# Altium PCB PCB2.PcbDoc
Units mil, origin at the board's own origin, x right, y up, seen from the top; angles counter-clockwise.
Board outline 6000 x 4000 mil, 2 copper layers (Top Layer, Bottom Layer); 34 components, 15 nets, 86 pads, 0 vias.
Unrouted connection lines stored in the file: 14.
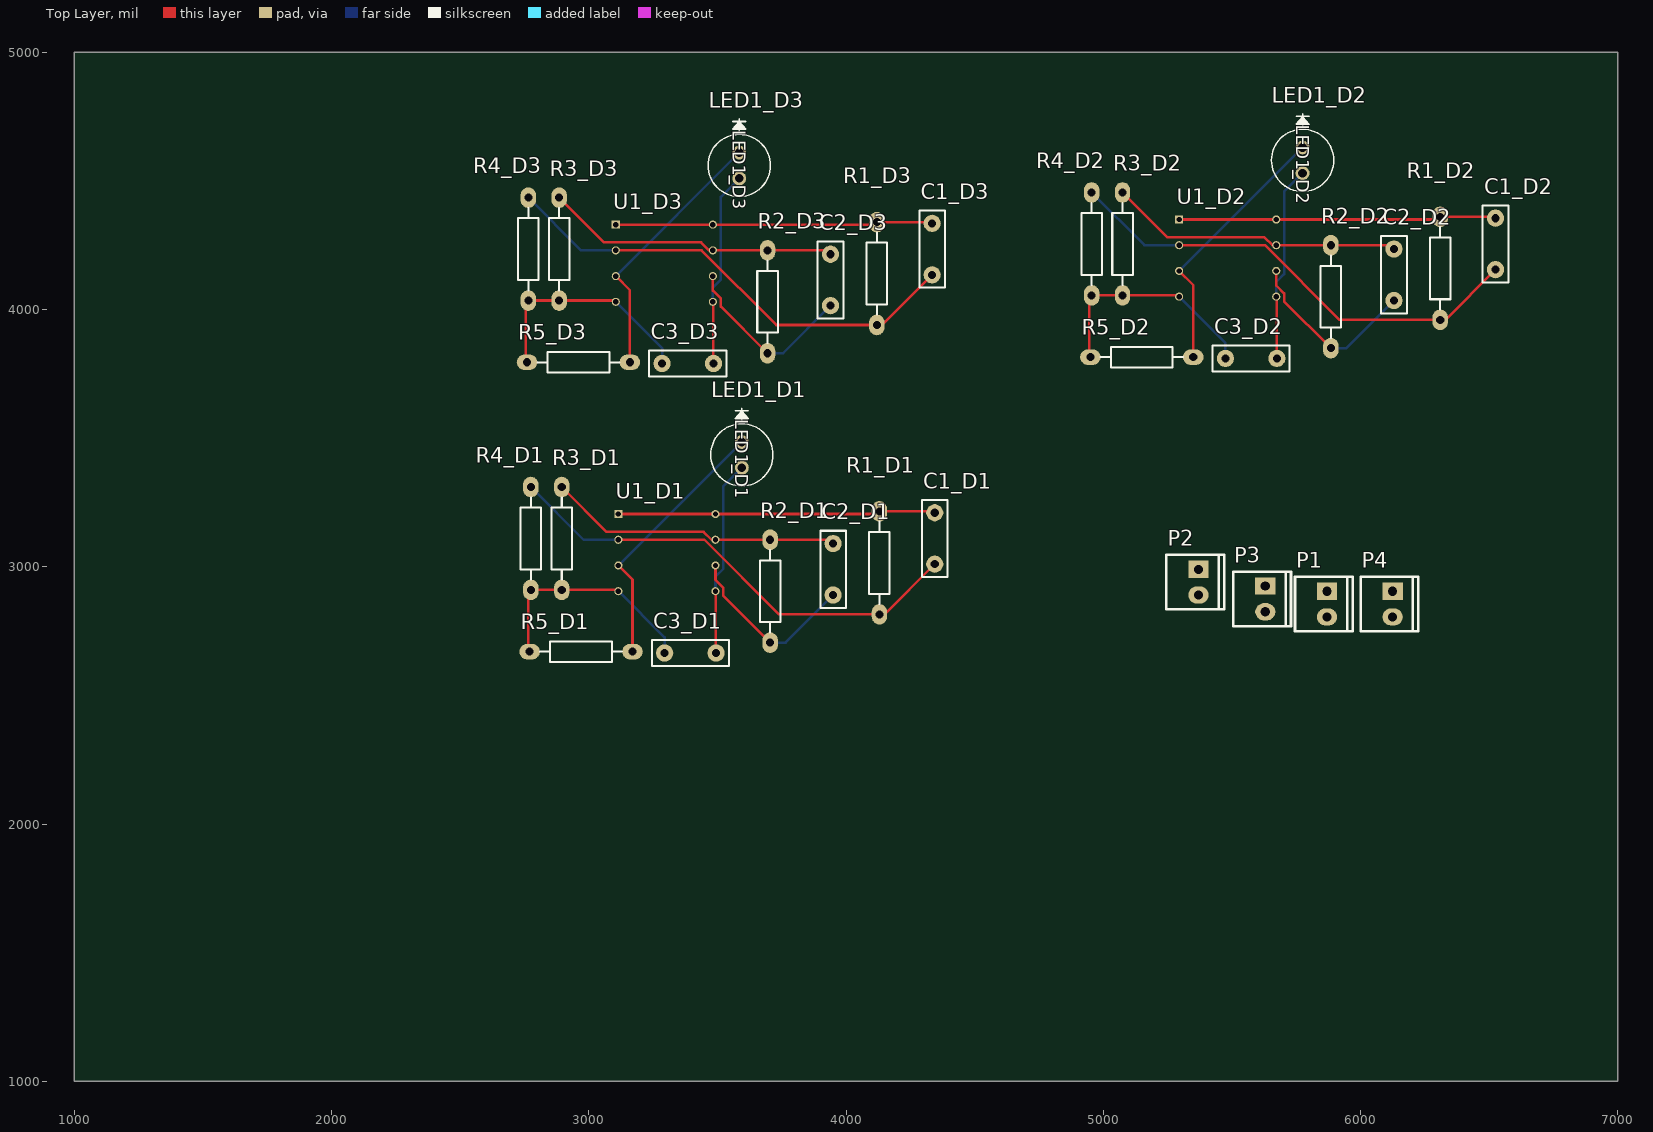
[diagram p0: Top Layer view]
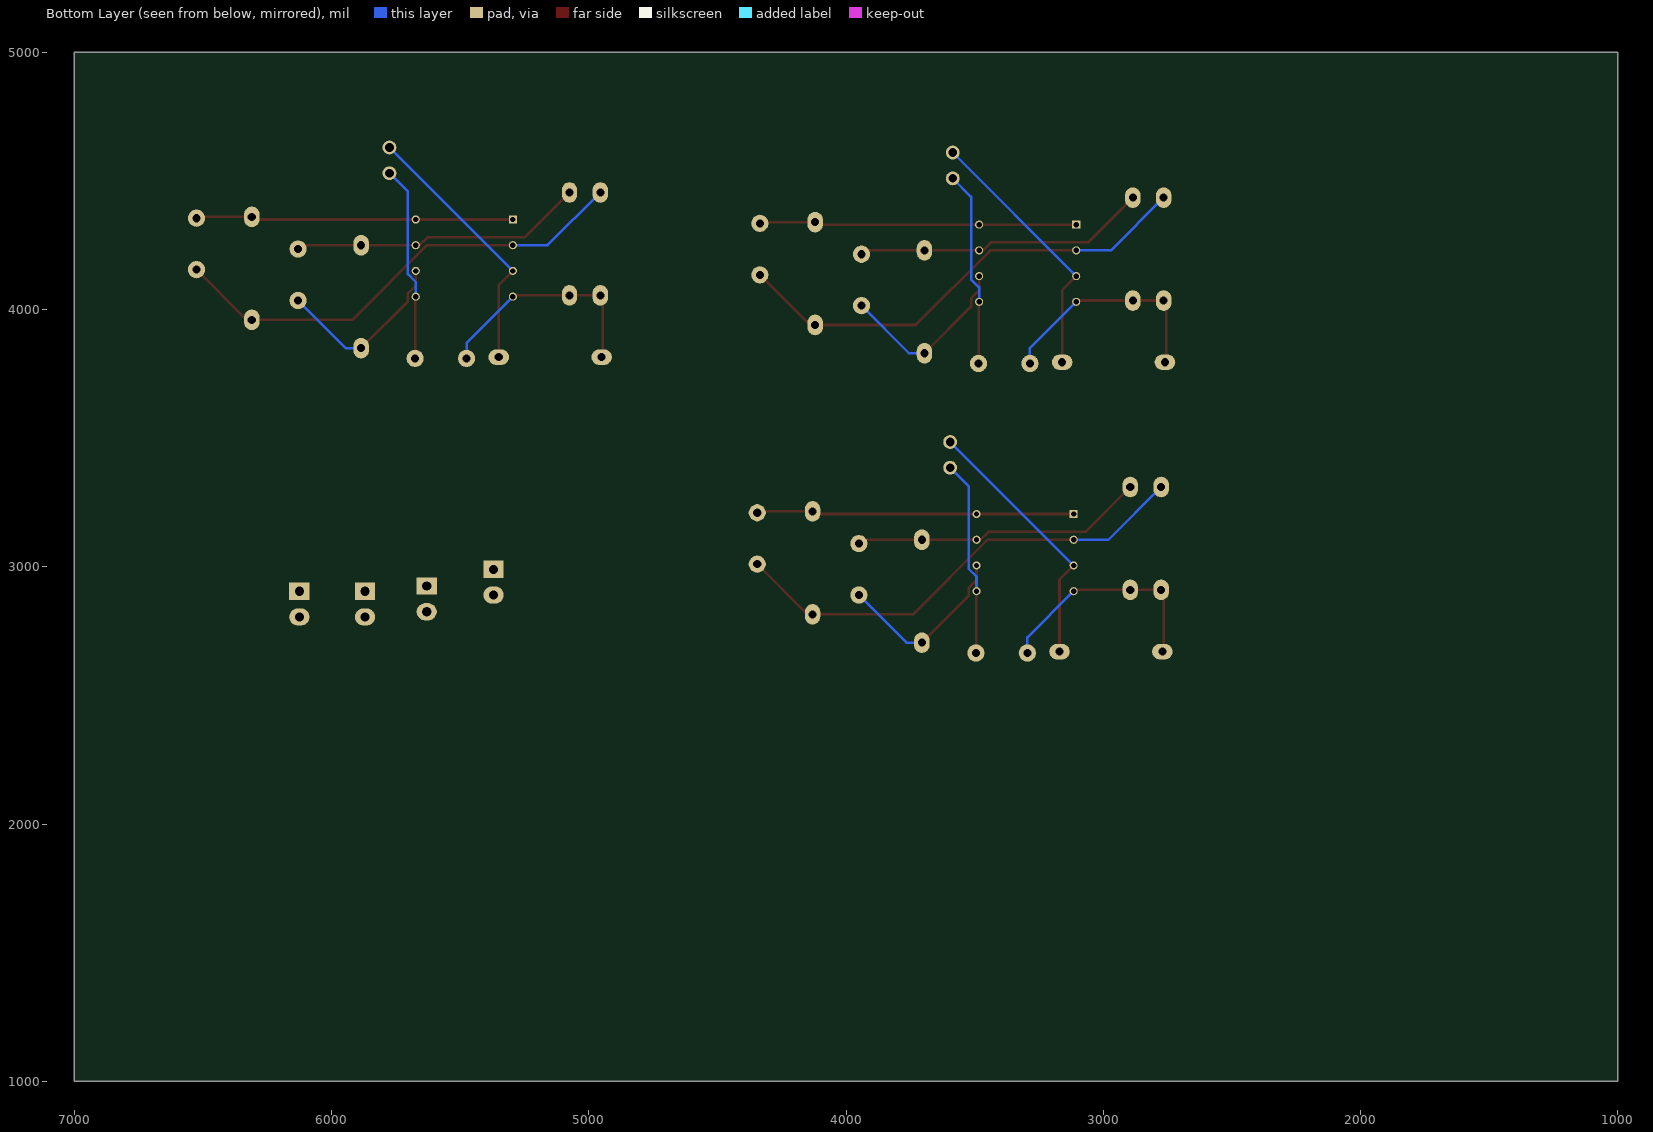
[diagram p1: Bottom Layer view, seen from below]
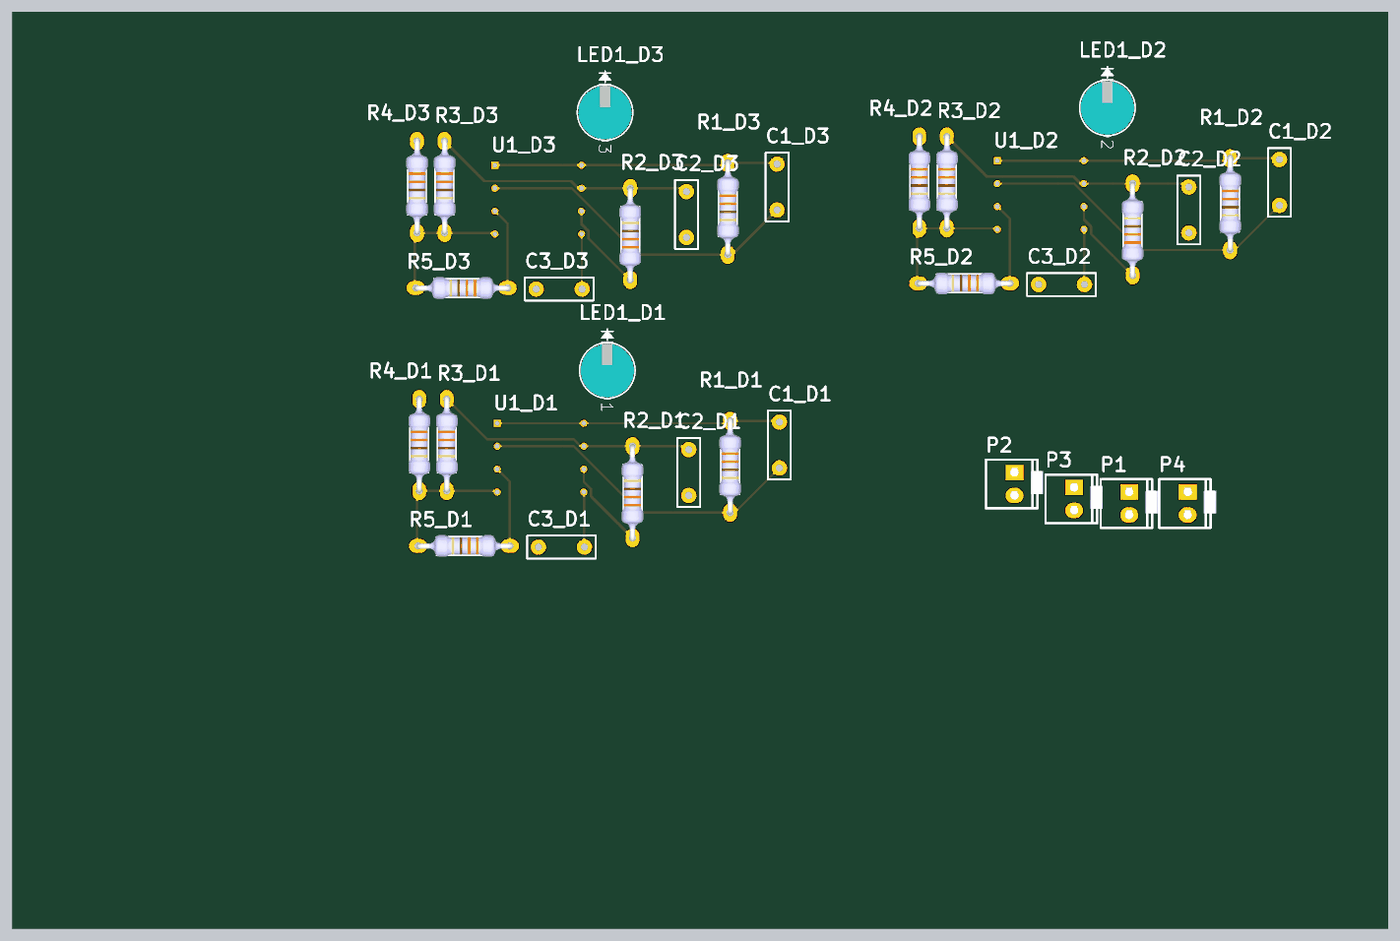
[diagram p2: 3D render of the assembled board from above, using the file's embedded part models]

## Layer stack, top to bottom
Top Solder: solder mask 0.4, Solder Resist, Dk 3.5
Top Layer: signal copper 1.4
Dielectric 1: dielectric 12.6, FR-4, Dk 4.8
Bottom Layer: signal copper 1.4
Bottom Solder: solder mask 0.4, Solder Resist, Dk 3.5

## Board outline
1000,1000 7000,1000 7000,5000 1000,5000

## Design rules (kind name [scope] priority, off if disabled: settings)
Clearance [All] p1: gap=10 ignorepadtopadclearanceinfootprint=FALSE
PolygonConnect [All] p1: connectstyle=Relief reliefconductorwidth=10 reliefentries=4 polygonreliefangle="90 Angle" airgapwidth=10
RoomDefinition D3 [InComponentClass('D3')] p1: confinementstyle=ConfineIn formatcopy=TRUE lockcomponents=FALSE outline 2500,3715 4590,3715 4590,4674.84 2500,4674.84
RoomDefinition D2 [InComponentClass('D2')] p2: confinementstyle=ConfineIn formatcopy=TRUE lockcomponents=FALSE outline 4690,3735 6780,3735 6780,4694.84 4690,4694.84
RoomDefinition D1 [InComponentClass('D1')] p3: confinementstyle=ConfineIn formatcopy=TRUE lockcomponents=FALSE outline 2510,2590 4600,2590 4600,3549.84 2510,3549.84
RoomDefinition 311prac [InComponentClass('311prac')] p4: confinementstyle=ConfineIn formatcopy=TRUE lockcomponents=FALSE outline 5075,2735 6255,2735 6255,3075 5075,3075
RoutingVias [All] p1: holewidth=28 width=50 viastyle="Through Hole" minholewidth=28 minwidth=50 maxholewidth=28 maxwidth=50
SolderMaskExpansion [All] p1: expansion=4 istentingtop=FALSE
SupplyNets "Schematic Supply Nets_5" [InNet('GND')] p1: voltage=0.000
SupplyNets "Schematic Supply Nets_4" [InNet('Photo C-V1')] p2: voltage=0.000
SupplyNets "Schematic Supply Nets_3" [InNet('PhotoOut')] p3: voltage=0.000
SupplyNets "Schematic Supply Nets_2" [InNet('PhotoOut3')] p4: voltage=0.000
SupplyNets "Schematic Supply Nets_1" [InNet('PhotoOut2')] p5: voltage=0.000
SupplyNets "Schematic Supply Nets" [InNet('+5')] p6: voltage=0.000
Width [All] p1: maxlimit=10 minlimit=10 preferedwidth=10
30 further rules are at their usual default settings.

## Classes and differential pairs
channel class LightSense: D1 D2 D3
component class D3: C1_D3 C2_D3 C3_D3 LED1_D3 R1_D3 R2_D3 R3_D3 R4_D3 R5_D3 U1_D3
component class D2: C1_D2 C2_D2 C3_D2 LED1_D2 R1_D2 R2_D2 R3_D2 R4_D2 R5_D2 U1_D2
component class D1: C1_D1 C2_D1 C3_D1 LED1_D1 R1_D1 R2_D1 R3_D1 R4_D1 R5_D1 U1_D1
component class 311prac: P1 P2 P3 P4

## Components (designator, comment, footprint, x,y, rotation, side; value= is the part's Value field where it differs from the comment)
C1_D1 "CAP000026" ECE-CAPR0.2x0.1TH 4345,3010 r90 top value=1.2nF (schematic designator C1)
C1_D2 "CAP000026" ECE-CAPR0.2x0.1TH 6525,4155 r90 top value=1.2nF (schematic designator C1)
C1_D3 "CAP000026" ECE-CAPR0.2x0.1TH 4335,4135 r90 top value=1.2nF (schematic designator C1)
C2_D1 "CAP000026" ECE-CAPR0.2x0.1TH 3950,3090 r270 top value=1.2nF (schematic designator C2)
C2_D2 "CAP000026" ECE-CAPR0.2x0.1TH 6130,4235 r270 top value=1.2nF (schematic designator C2)
C2_D3 "CAP000026" ECE-CAPR0.2x0.1TH 3940,4215 r270 top value=1.2nF (schematic designator C2)
C3_D1 "CAP000026" ECE-CAPR0.2x0.1TH 3295,2665 r0 top value=1.2nF (schematic designator C3)
C3_D2 "CAP000026" ECE-CAPR0.2x0.1TH 5475,3810 r0 top value=1.2nF (schematic designator C3)
C3_D3 "CAP000026" ECE-CAPR0.2x0.1TH 3285,3790 r0 top value=1.2nF (schematic designator C3)
LED1_D1 "SFH 213 FA" "LED_SFH 213 FA_OSR" 3595,3485 r270 top (schematic designator LED1)
LED1_D2 "SFH 213 FA" "LED_SFH 213 FA_OSR" 5775,4630 r270 top (schematic designator LED1)
LED1_D3 "SFH 213 FA" "LED_SFH 213 FA_OSR" 3585,4610 r270 top (schematic designator LED1)
P1 "CON000001" ECE-600102STTH 5870,2905 r0 top value="2 Way"
P2 "CON000001" ECE-600102STTH 5370,2990 r0 top value="2 Way"
P3 "CON000001" ECE-600102STTH 5630,2925 r0 top value="2 Way"
P4 "CON000001" ECE-600102STTH 6125,2905 r0 top value="2 Way"
R1_D1 "RES000058" ECE-RESA0.4TH 4130.31,2814.84 r90 top value=56k (schematic designator R1)
R1_D2 "RES000058" ECE-RESA0.4TH 6310.31,3959.84 r90 top value=56k (schematic designator R1)
R1_D3 "RES000058" ECE-RESA0.4TH 4120.31,3939.84 r90 top value=56k (schematic designator R1)
R2_D1 "RES000058" ECE-RESA0.4TH 3704.68,3105.16 r270 top value=56k (schematic designator R2)
R2_D2 "RES000058" ECE-RESA0.4TH 5884.69,4250.16 r270 top value=56k (schematic designator R2)
R2_D3 "RES000058" ECE-RESA0.4TH 3694.68,4230.16 r270 top value=56k (schematic designator R2)
R3_D1 "" ECE-RESA0.4TH 2895.32,2909.84 r90 top value=56k (schematic designator R3)
R3_D2 "" ECE-RESA0.4TH 5075.31,4054.84 r90 top value=56k (schematic designator R3)
R3_D3 "" ECE-RESA0.4TH 2885.32,4034.84 r90 top value=56k (schematic designator R3)
R4_D1 "RES000058" ECE-RESA0.4TH 2775.32,2909.84 r90 top value=56k (schematic designator R4)
R4_D2 "RES000058" ECE-RESA0.4TH 4955.31,4054.84 r90 top value=56k (schematic designator R4)
R4_D3 "RES000058" ECE-RESA0.4TH 2765.32,4034.84 r90 top value=56k (schematic designator R4)
R5_D1 "RES000058" ECE-RESA0.4TH 2769.84,2669.68 r0 top value=56k (schematic designator R5)
R5_D2 "RES000058" ECE-RESA0.4TH 4949.84,3814.68 r0 top value=56k (schematic designator R5)
R5_D3 "RES000058" ECE-RESA0.4TH 2759.84,3794.68 r0 top value=56k (schematic designator R5)
U1_D1 "TLC082CP" TLC082_TH 3115,3205 r0 top (schematic designator U1)
U1_D2 "TLC082CP" TLC082_TH 5295,4350 r0 top (schematic designator U1)
U1_D3 "TLC082CP" TLC082_TH 3105,4330 r0 top (schematic designator U1)

## Footprints (in the part's own frame and the unit in brackets; to place one, negate y for a bottom-side part, rotate by r counter-clockwise, add the part's x,y. Pads: shape width x height; smd on the part's side, far side on the other; paste and mask are expansions set on the pad)
ECE-600102STTH [mm] "Polarised Header 2 way"
  rect 2x1.7 hole 0.9: 1(0,0)
  oval 2x1.7 hole 0.9: 2(0,-2.54)
  silkscreen extent -3.16,-3.96 2.54,1.42, body extent -3.3,-3.64 3.17,1.44, height 7.39
ECE-CAPR0.2x0.1TH [mm] "Radial non polarised Capacitor"
  round 1.7 hole 0.8: 1(0,0) 2(5.08,0)
  silkscreen extent -1.27,-1.27 6.35,1.27
ECE-RESA0.4TH [mil] "Resistor Axial 10mm"
  oval 80x60 hole 31.5: 1(0.16,0.31) 2(400.16,0.31)
  silkscreen extent 40,-40 360,40, body extent -7,-47 417,47, height 95
"LED_SFH 213 FA_OSR" [mil]
  round 54 hole 34 paste-99999 mask+0: 1(0,0) 2(100,0)
  silkscreen extent -131,-121 171,121, body extent -66,-116 166,116, height 355
TLC082_TH [mm] "Footprint only for TLC082"
  rect 0.8x0.8 hole 0.53: 1(0,0)
  round 0.8 hole 0.53: 2(0,-2.54) 3(0,-5.08) 4(0,-7.62) 5(9.59,0) 6(9.59,-2.54) 7(9.59,-5.08) 8(9.59,-7.62)

## Part data
C1_D1 C1_D2 C1_D3 C2_D1 C2_D2 C2_D3 C3_D1 C3_D2 C3_D3: library part CMP-039-000025-1, "CAP CER 1.2nF 50V TH", Size/Package=Radial, Voltage/Current=50V, Assembly Method="Through hole", Category=Capacitor, Component Type=NA, Datasheet Link=http://share.engineering.auckland.ac.nz/ece/ts/Student%20Documents/CER%20CAP.pdf, Item Type=Item, Path="ece/ts/Lists/Stock Inventory", Status=Obsolete, UoA Stock#=CAP000026
LED1_D1 LED1_D2 LED1_D3: "Description", Manufacturer_Name="ams OSRAM", Copyright="Copyright (C) 2026 Ultra Librarian. All rights reserved.", Manufacturer_Part_Number="SFH 213 FA"
P1 P2 P3 P4: library part CMP-040-000000-1, "HEADER POLARISED 2WAY TH", Manufactuer=GTK, Manufacturer-PN=600102ST, Size/Package="2.54 Radial", Assembly Method="Through hole", Category=Connector, Component Type=NA, Datasheet Link=http://share.engineering.auckland.ac.nz/ece/ts/Student%20Documents/polarised_connectors.pdf, Item Type=Item, Path="ece/ts/Lists/Stock Inventory", Status=Active, Supplier1=Elecon, Supplier1-PN=YY3N02, Supplier2="Active Components", Supplier2-PN=600102ST, UoA Stock#=CON000001
R1_D1 R1_D2 R1_D3 R2_D1 R2_D2 R2_D3 R3_D1 R3_D2 R3_D3 R4_D1 R4_D2 R4_D3 R5_D1 R5_D2 R5_D3: library part CMP-052-000057-1, "RES MF 56K TH", Size/Package="Axial 10mm", Voltage/Current=0.6W, Assembly Method="Through hole", Category=Resistor, Component Type=NA, Item Type=Item, Path="ece/ts/Lists/Stock Inventory", Status=Active, Supplier1="Active components", Supplier1-PN=T442124, UoA Stock#=RES000058
U1_D1 U1_D2 U1_D3: "Dual, 16-V, 10-MHz, In to V- op amp 8-PDIP 0 to 70", Manufacturer_Name="Texas Instruments", Copyright="Copyright (C) 2026 Ultra Librarian. All rights reserved.", Datasheet=https://www.ti.com/lit/gpn/tlc082, Manufacturer_Part_Number=TLC082CP, RefDes=RefDes, Type=Type

## Nets (pads, with @x,y where several pads share a name; then routed paths per layer and width w, separated by ;. In a path a pad name is that pad's centre, name@x,y a point inside that pad or via, vN(x,y) a via of type N, cw(c..) or ccw(c..) an arc to the next point about the centre after c; other vN are vias at no path point)
+5: C3_D1.2 C3_D2.2 C3_D3.2 LED1_D1.2 LED1_D2.2 LED1_D3.2 P1.1 U1_D1.8 U1_D2.8 U1_D3.8 | length 2290.3
  Top Layer w10: U1_D3.8 3483.78,4028.78 3483.78,3791.22 C3_D3.2 ; U1_D1.8 3493.78,2903.78 3493.78,2666.22 C3_D1.2 ; U1_D2.8 5673.78,4048.78 5673.78,3811.22 C3_D2.2
  Bottom Layer w10: U1_D3.8 3482.56,4086.52 3513.31,4117.26 3513.31,4438.31 LED1_D3.2 ; U1_D1.8 3492.56,2961.52 3523.31,2992.26 3523.31,3313.31 LED1_D1.2 ; U1_D2.8 5672.56,4106.52 5703.31,4137.26 5703.31,4458.31 LED1_D2.2
GND: C3_D1.1 C3_D2.1 C3_D3.1 P1.2 P2.2 P3.2 P4.2 R3_D1.1 R3_D2.1 R3_D3.1 R4_D1.1 R4_D2.1 R4_D3.1 R5_D1.1 R5_D2.1 R5_D3.1 U1_D1.4 U1_D2.4 U1_D3.4 | length 2726.1
  Top Layer w10: R5_D3.1 2755,3800 2755,4035 2865,4035 2935,4035 3100,4035 U1_D3.4 ; R5_D1.1 2765,2675 2765,2910 2875,2910 2945,2910 3110,2910 U1_D1.4 ; R5_D2.1 4945,3820 4945,4055 5055,4055 5125,4055 5290,4055 U1_D2.4
  Bottom Layer w10: U1_D3.4 3285,3850 C3_D3.1 ; U1_D1.4 3295,2725 C3_D1.1 ; U1_D2.4 5475,3870 C3_D2.1
NetC1_D1_1: C1_D1.1 R1_D1.1 R4_D1.2 U1_D1.2 | length 1855.8
  Top Layer w10: U1_D1.2 3449.07,3105 3739.07,2815 R1_D1.1 4150,2815 C1_D1.1
  Bottom Layer w10: R4_D1.2 2980,3105 U1_D1.2
NetC1_D1_2: C1_D1.2 R1_D1.2 U1_D1.1 U1_D1.5 | length 1236.2
  Top Layer w10: U1_D1.1 U1_D1.5 4120,3205 R1_D1.2 4340,3215 C1_D1.2
NetC1_D2_1: C1_D2.1 R1_D2.1 R4_D2.2 U1_D2.2 | length 1855.8
  Top Layer w10: U1_D2.2 5629.07,4250 5919.07,3960 R1_D2.1 6330,3960 C1_D2.1
  Bottom Layer w10: R4_D2.2 5160,4250 U1_D2.2
NetC1_D2_2: C1_D2.2 R1_D2.2 U1_D2.1 U1_D2.5 | length 1236.2
  Top Layer w10: U1_D2.1 U1_D2.5 6300,4350 R1_D2.2 6520,4360 C1_D2.2
NetC1_D3_1: C1_D3.1 R1_D3.1 R4_D3.2 U1_D3.2 | length 1855.8
  Top Layer w10: U1_D3.2 3439.07,4230 3729.07,3940 R1_D3.1 4140,3940 C1_D3.1
  Bottom Layer w10: R4_D3.2 2970,4230 U1_D3.2
NetC1_D3_2: C1_D3.2 R1_D3.2 U1_D3.1 U1_D3.5 | length 1236.2
  Top Layer w10: U1_D3.1 U1_D3.5 4110,4330 R1_D3.2 4330,4340 C1_D3.2
NetC2_D1_1: C2_D1.1 R2_D1.1 R3_D1.2 U1_D1.6 | length 1146.1
  Top Layer w10: R3_D1.2 3069.25,3135.75 3446.61,3135.75 3477.36,3105 U1_D1.6 R2_D1.1 3935,3105 C2_D1.1
NetC2_D2_1: C2_D2.1 R2_D2.1 R3_D2.2 U1_D2.6 | length 1146.1
  Top Layer w10: R3_D2.2 5249.25,4280.75 5626.61,4280.75 5657.36,4250 U1_D2.6 R2_D2.1 6115,4250 C2_D2.1
NetC2_D3_1: C2_D3.1 R2_D3.1 R3_D3.2 U1_D3.6 | length 1146.1
  Top Layer w10: R3_D3.2 3059.25,4260.75 3436.61,4260.75 3467.36,4230 U1_D3.6 R2_D3.1 3925,4230 C2_D3.1
"Photo C-V1": LED1_D1.1 LED1_D2.1 LED1_D3.1 R5_D1.2 R5_D2.2 R5_D3.2 U1_D1.3 U1_D2.3 U1_D3.3 | length 3109.8
  Top Layer w10: U1_D3.3 3160,4075 R5_D3.2 ; U1_D1.3 3170,2950 R5_D1.2 ; U1_D2.3 5350,4095 R5_D2.2
  Bottom Layer w10: U1_D3.3 LED1_D3.1 ; U1_D1.3 LED1_D1.1 ; U1_D2.3 LED1_D2.1
PhotoOut: C2_D1.2 P2.1 R2_D1.2 U1_D1.7 | length 709.6
  Top Layer w10: U1_D1.7 3492.56,2948.48 3523.31,2917.74 3523.31,2886.69 R2_D1.2
  Bottom Layer w10: R2_D1.2 3765,2705 C2_D1.2
PhotoOut2: C2_D2.2 P3.1 R2_D2.2 U1_D2.7 | length 709.6
  Top Layer w10: U1_D2.7 5672.56,4093.48 5703.31,4062.74 5703.31,4031.69 R2_D2.2
  Bottom Layer w10: R2_D2.2 5945,3850 C2_D2.2
PhotoOut3: C2_D3.2 P4.1 R2_D3.2 U1_D3.7 | length 709.6
  Top Layer w10: U1_D3.7 3482.56,4073.48 3513.31,4042.74 3513.31,4011.69 R2_D3.2
  Bottom Layer w10: R2_D3.2 3755,3830 C2_D3.2